# Altium PCB DAPLink GD32F103RCT6.PcbDoc (part 2 of 2)
Units mil, origin at the board's own origin, x right, y up, seen from the top; angles counter-clockwise.
Board outline 3485 x 2855 mil, 2 copper layers (Top Layer, Bottom Layer); 95 components, 93 nets, 322 pads, 225 vias.
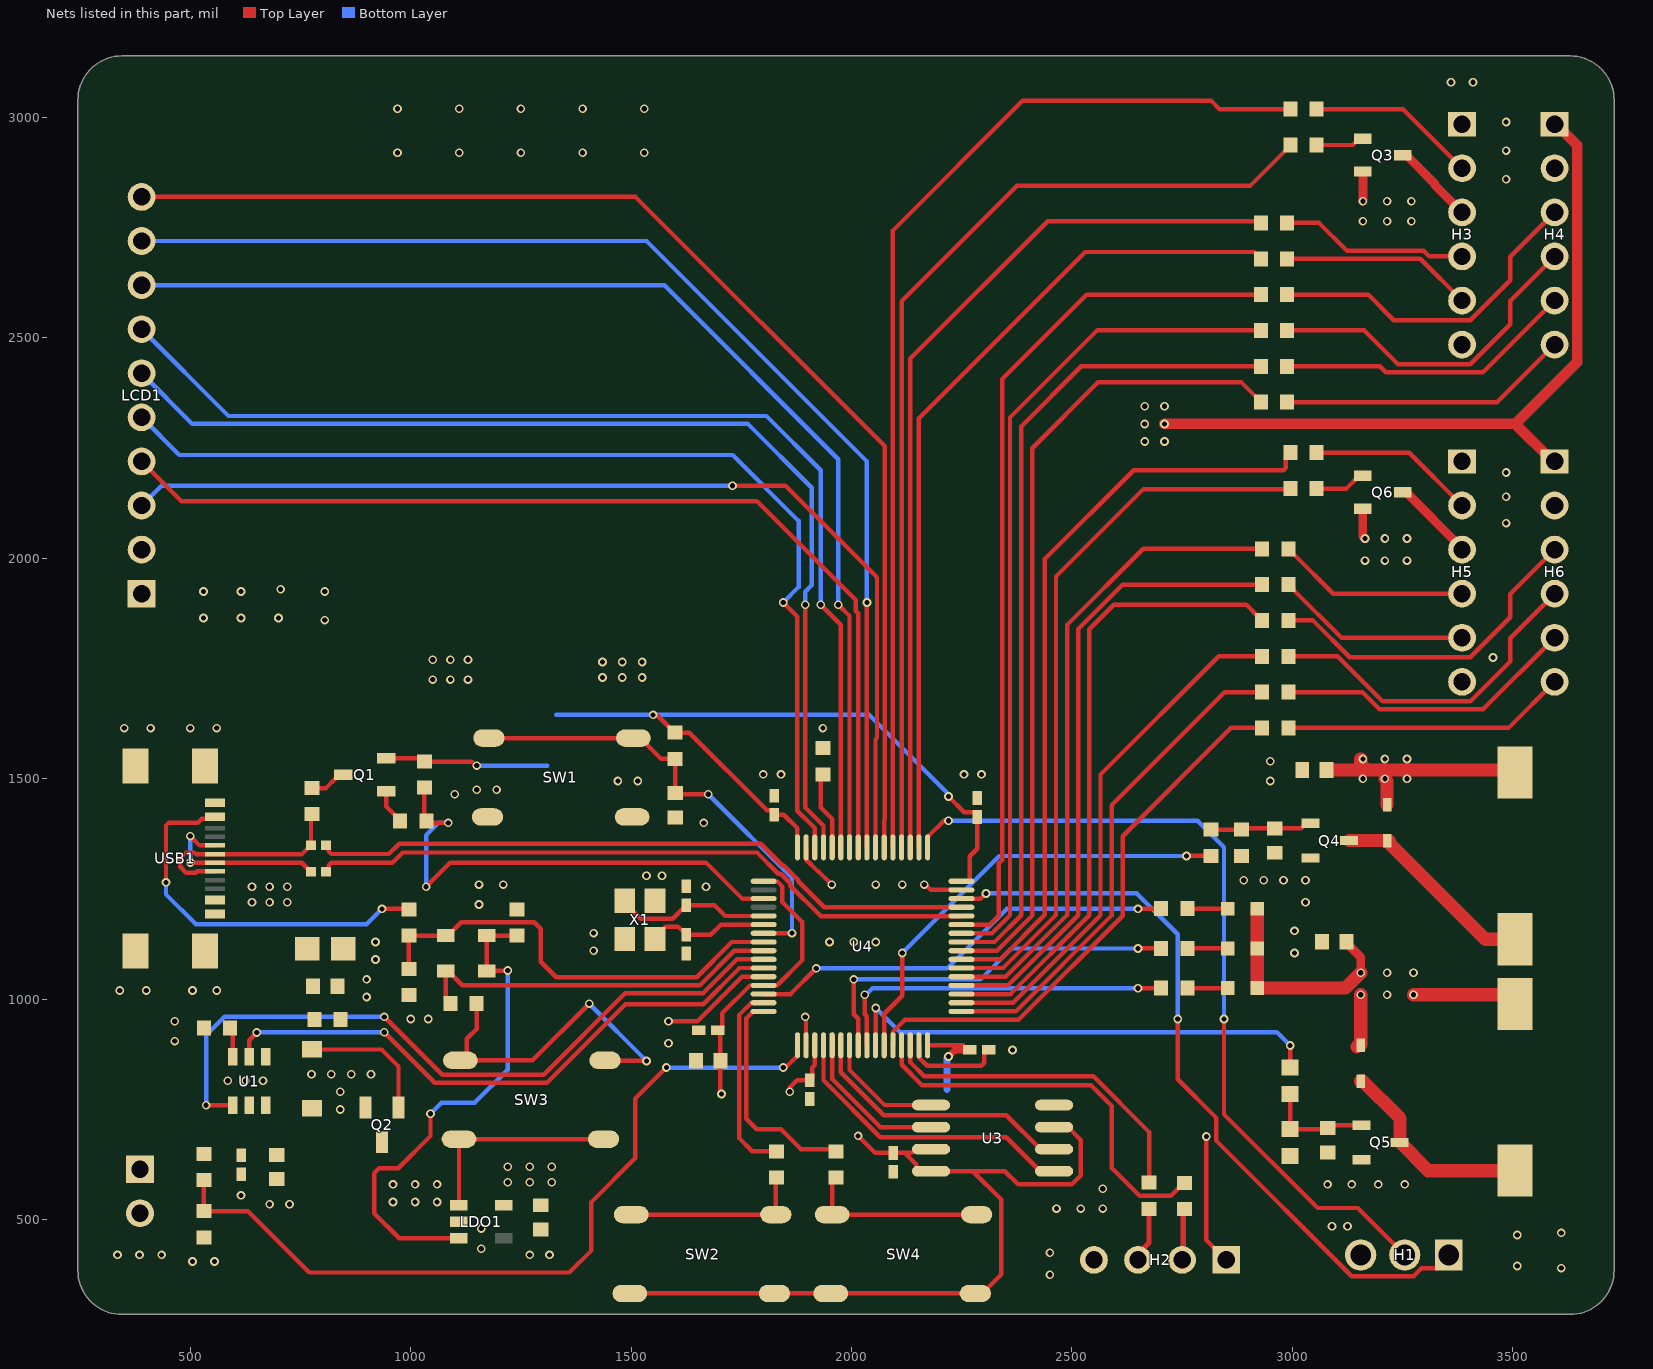
[diagram p2: the nets of this part, all layers, seen from the top]

## Part data
BUZZER1 BUZZER2: "驱动方式:有源(内含驱动线路);构造类型:电磁式;额定电压:3.3V;频率:2.7kHz;声压(SPL):80dB;", Continuous Operating Time=-, Current Consumption=30mA, JLCPCB Part Class="Extended Part", LCSC Part Name="9.6*9.6*5mm电磁有源 3V", Manufacturer=INGHAi(赢海), ManufacturerPart=GSD9605YB-3V2800, Operating Temperature=-20℃~+70℃, Voltage - Supply=2V~5V, Voltage Rating=3.3V, AddInBom=yes, ConvertToPcb=yes, Datasheet=https://item.szlcsc.com/datasheet/GSD9605YB-3V2800/249279.html, Diameter(φD)=-, Driver Circuitry=有源(内含驱动线路), FootprintName=BUZ-SMD_GSD9605YB-3V2800, Height=5.2mm, Lead Pitch=-, Length=9.6mm, ModelId=d9f071f9511e4f7795b1f85db8085480, ModelName=BUZ-SMD_L9.6-W9.6-H5.0, ModelTransform=393.7,377.952,0,270,0,0,0,0,0, Mounting Type=贴片, Sound Pressure Level(SPL)=80dB, Supplier=LCSC, Supplier Footprint=SMD,9.6x9.6mm, SupplierPart=C255327, Symbol=GSD9605YB-3V2800, Technology=电磁式, Width=9.6mm
C1 C7 C9 C10 C11 C12 C13 C14 C16 C17 C18 C19: library part CC0402CRNPO9BN100, "容值:10pF;精度:±0.25pF;额定电压:50V;温度系数:NP0;", JLCPCB Part Class="Extended Part", LCSC Part Name="10pF ±0.25pF 50V", Manufacturer=YAGEO(国巨), Temperature Coefficient=NP0, Tolerance=±0.25pF, Voltage Rated=50V, AddInBom=yes, ConvertToPcb=yes, Datasheet=https://atta.szlcsc.com/upload/public/pdf/source/20200508/C526974_3517A3A30DC68049E27EE400BC6F4C82.pdf, Device=CC0402CRNPO9BN100, FootprintName=C0402, ManufacturerPart=CC0402CRNPO9BN100, ModelId=36a51122f27c49738f86b3bfa98863e0, ModelName=C0402_L1.0-W0.5-H0.5, ModelTransform=39.37,19.685,0,0,0,0,0,0,0, Supplier=LCSC, Supplier Footprint=0402, SupplierPart=C526974, Symbol=CC0402CRNPO9BN100
C2 C4 C5 C15: library part C0603C102K1RAC3083, "容值:1nF;精度:±10%;额定电压:100V;温度系数:X7R;", JLCPCB Part Class="Extended Part", LCSC Part Name="1nF ±10% 100V", Manufacturer=KEMET(基美), Temperature Coefficient=X7R, Tolerance=±10%, Voltage Rated=100V, AddInBom=yes, ConvertToPcb=yes, Datasheet=https://atta.szlcsc.com/upload/public/pdf/source/20200618/C599608_2B9CFB7169FD5127D28BF69D59417288.pdf, Device=C0603C102K1RAC3083, FootprintName=C0603, ManufacturerPart=C0603C102K1RAC3083, ModelId=ac125912035d415993ca9572d50418b1, ModelName=C0603_L1.6-W0.8-H0.8, ModelTransform=62.992,31.496,0,0,0,0,0,0,0, Supplier=LCSC, Supplier Footprint=0603, SupplierPart=C561818, Symbol=C0603C102K1RAC3083
C3: library part CS0805KKX7R8BB105, "容值:1uF;精度:±10%;额定电压:25V;温度系数:X7R;", JLCPCB Part Class="Extended Part", LCSC Part Name="1uF ±10% 25V", Manufacturer=YAGEO(国巨), Temperature Coefficient=X7R, Tolerance=±10%, Voltage Rated=25V, AddInBom=yes, ConvertToPcb=yes, Datasheet=https://atta.szlcsc.com/upload/public/pdf/source/20180820/C272869_BA73BCEFB473D3E1AF31EC64F07F73BB.pdf, Device=CS0805KKX7R8BB105, FootprintName=C0805, ManufacturerPart=CS0805KKX7R8BB105, ModelId=1ba041120af144c991958decab20d241, ModelName=C0805_L2.0-W1.3-H1.3, ModelTransform=78.74,51.181,0,0,0,0,0,0.0005,0, Supplier=LCSC, Supplier Footprint=0805, SupplierPart=C272869, Symbol=CS0805KKX7R8BB105
C6 C8: library part GCM1555C1H200JA16D, "容值:20pF;精度:±5%;额定电压:-;温度系数:-;", JLCPCB Part Class="Extended Part", LCSC Part Name="20pF(200) ±5% 50V", Manufacturer=muRata(村田), Temperature Coefficient=-, Tolerance=±5%, AddInBom=yes, ConvertToPcb=yes, Datasheet=https://atta.szlcsc.com/upload/public/pdf/source/20200713/C701256_2542DCDD70722D2BE0CCE4799A0421BC.pdf, Device=GCM1555C1H200JA16D, FootprintName=C0402, ManufacturerPart=GCM1555C1H200JA16D, ModelId=36a51122f27c49738f86b3bfa98863e0, ModelName=C0402_L1.0-W0.5-H0.5, ModelTransform=39.37,19.685,0,0,0,0,0,0,0, Supplier=LCSC, Supplier Footprint=0402, SupplierPart=C343868, Symbol=GCM1555C1H200JA16D, Voltage Rated=-
D1 D2: "1000V,1A,VF=1.1V@1A，M7小封装", JLCPCB Part Class=扩展库, Manufacturer=MDD, AddInBom=yes, ConvertToPcb=yes, Datasheet=https://atta.szlcsc.com/upload/public/pdf/source/20180525/C193404_0C623596A90FA1D1FBDCFE625FBC3C97.pdf, Device=1N4007WS, FootprintName=SOD-323_L1.8-W1.3-LS2.5-RD, LCSC Part Name=1N4007WS, ManufacturerPart=1N4007WS, ModelId=e9dd044ee7bf4221b3b795eb56bce7c0, ModelName=SOD-323_L1.7-W1.3-H1.1-LS2.5, ModelTransform=98.91933,51.181,0,180,0,0,0.985,-0.0005,0, Supplier=LCSC, Supplier Footprint=SOD-323, SupplierPart=C193404, Symbol=1N4007WS
D3: library part "DSK24 K24", "直流反向耐压(Vr):40V;平均整流电流(Io):2A;正向压降(Vf):550mV@2A;", Average Rectified Current (Io)=2A, Forward Voltage (Vf@If)=550mV@2A, JLCPCB Part Class="Extended Part", LCSC Part Name="40V 2A 550mV@2A", Manufacturer=MDD, Reverse Voltage (Vr)=40V, AddInBom=yes, ConvertToPcb=yes, Datasheet=https://atta.szlcsc.com/upload/public/pdf/source/20190305/C64890_FF2133F90E969198891C9074DED26AB5.pdf, Device="DSK24 K24", FootprintName=SOD-123_L2.8-W1.8-LS3.7-RD, ManufacturerPart="DSK24 K24", ModelId=7884390a25fb4c08947731ebfba7e3f8, ModelName=SOD-123_L2.8-W1.8-LS3.7-RD, ModelTransform=144.9,63,0,0,0,0,0,0,0, Supplier=LCSC, Supplier Footprint=SOD-123FL, SupplierPart=C64890, Symbol="DSK24 K24"
D4 D5: "二极管配置:独立式;整流电流:150mA;直流反向耐压(Vr):100V;正向压降(Vf):1.25V@150mA;反向恢复时间(Trr):4ns;", Current - Rectified=150mA, JLCPCB Part Class="Extended Part", LCSC Part Name="100V 150mA", Manufacturer=R+O(宏嘉诚), ManufacturerPart=1N4148WS, Non-Repetitive Peak Forward Surge Current=2A, Operating Junction Temperature Range=-55℃~+150℃, Pd - Power Dissipation=200mW, Reverse Leakage Current (Ir)=1uA@75V, Voltage - DC Reverse(Vr)=100V, Voltage - Forward(Vf@If)=1.25V@150mA, AddInBom=yes, ConvertToPcb=yes, Datasheet=https://item.szlcsc.com/datasheet/1N4148WS/8397141.html, Diode Configuration=独立式, FootprintName=SOD-323_L1.7-W1.3-LS2.5-FD, ModelId=0f2f330c645944df9245ac3c3fec3456, ModelName=SOD-323_L1.7-W1.3-LS2.5-FD, ModelTransform=98.425,49.2125,0,180,0,0,0,0,0, Reverse Recovery Time (trr)=4ns, Supplier=LCSC, Supplier Footprint=SOD-323, SupplierPart=C7420319, Symbol=1N4148WS_C7420319
H1: library part 2.54-1*3P针, "间距:2.54mm;总PIN位数:3;排数:1;插针结构:-;行距:-;安装类型:直插;圆针/方针:-;额定电流:-;额定电压:-;配合针长度:-;塑高:-;触头材质:-;触头镀层:-;颜色:黑色;", Color=黑色, Current Rating (Max)=-, JLCPCB Part Class="Extended Part", LCSC Part Name=2.54mm, Manufacturer=BOOMELE(博穆精密), AddInBom=yes, Circluar Pins/Square Pins=-, Contact Material=-, Contact Plating=-, ConvertToPcb=yes, Datasheet=https://atta.szlcsc.com/upload/public/pdf/source/20151109/1457707570948.pdf, Device=2.54-1*3P针, FootprintName=HDR-TH_3P-P2.54-V-M-1, Insulation Height=-, Length of Mating Pin=-, ManufacturerPart=2.54-1*3P针, ModelId=94a8ffe137b6410295cb18cd3ffd99db, ModelName=HDR-M-2.54_1x3, ModelTransform=300,100,0,0,0,0,0,0,-118.1, Mounting Type=直插, Number of Pins=3, Number of Rows=1, Pin Structure=-, Pitch=2.54mm, Row Spacing=-, Supplier=LCSC, Supplier Footprint=插件, SupplierPart=C49257, Symbol=Header-Male-2.54_1x3, Voltage Rating (Max)=-
H2: "插针结构:1x4P;间距:2.54mm;圆针/方针:方针;安装方式:直插;排数:单排;总PIN位数:4P;额定电流:3A;额定电压:250V;配合针长度:6mm;塑高:2.5mm;端接针长度:3mm;触头材质:黄铜;触头镀层:金;工作温度:-25℃~+80℃;颜色:黑色;", Color=黑色, Current Rating=3A, JLCPCB Part Class="Extended Part", LCSC Part Name="1x4P 间距:2.54mm 方针 直插", Manufacturer=LAILAN(莱联), ManufacturerPart=LAIL-PZ2.54-4P-L, Operating Temperature=-25℃~+80℃, Voltage Rating (Max)=250V, AddInBom=yes, Circluar Pins/Square Pins=方针, Contact Material=黄铜, Contact Plating=金, ConvertToPcb=yes, Datasheet=https://item.szlcsc.com/datasheet/LAIL-PZ2.54-4P-L/58519955.html, FootprintName=CONN-TH_LAIL-PZ2.54-4P-L, Insulation Height=2.5mm, Length of End Connection Pin=3mm, Length of Mating Pin=6mm, ModelId=112b012cb4004446aa5386c9c86d05f0, ModelName=CONN-TH_LAIL-PZ2.54-4P-L, ModelTransform=400.039,100,0,0,0,0,0,0,-118.11, Mounting Type=直插, Number of Pins=4P, Number of Rows=单排, Pin Structure=1x4P, Pitch=2.54mm, Supplier=LCSC, Supplier Footprint=插件,P=2.54mm, SupplierPart=C54950602, SymbolName=LAIL-PZ2.54-4P-L
H3 H4 H5 H6: "插针结构:1x6P;间距:2.54mm;圆针/方针:方针;安装方式:直插;排数:单排;总PIN位数:6P;额定电流:3A;额定电压:250V;配合针长度:6mm;塑高:2.5mm;端接针长度:3mm;触头材质:黄铜;触头镀层:金;工作温度:-25℃~+80℃;颜色:黑色;", Color=黑色, Current Rating=3A, JLCPCB Part Class="Extended Part", LCSC Part Name="1x6P 间距:2.54mm 方针 直插", Manufacturer=LAILAN(莱联), ManufacturerPart=LAIL-PZ2.54-6P-L, Operating Temperature=-25℃~+80℃, Voltage Rating (Max)=250V, AddInBom=yes, Circluar Pins/Square Pins=方针, Contact Material=黄铜, Contact Plating=金, ConvertToPcb=yes, Datasheet=https://item.szlcsc.com/datasheet/LAIL-PZ2.54-6P-L/58519960.html, FootprintName=CONN-TH_LAIL-PZ2.54-6P-L, Insulation Height=2.5mm, Length of End Connection Pin=3mm, Length of Mating Pin=6mm, ModelId=78d66b34ad7c4f8faa1ccf54151694d8, ModelName=CONN-TH_LAIL-PZ2.54-6P-L, ModelTransform=599.999,98.8187,0,0,0,0,0,0,-118.11, Mounting Type=直插, Number of Pins=6P, Number of Rows=单排, Pin Structure=1x6P, Pitch=2.54mm, Supplier=LCSC, Supplier Footprint=插件,P=2.54mm, SupplierPart=C54950607, SymbolName=LAIL-PZ2.54-6P-L
LCD1: "核心芯片:ST7789;尺寸(inch):2;像素分辨率:320x240;", JLCPCB Part Class="Extended Part", LCSC Part Name=2.0寸240*320(RGB)彩色SPI串口TFT液晶显示屏, Manufacturer=HS(汉昇), ManufacturerPart=HS20S010B, Operating Temperature=-20℃~+70℃, AddInBom=yes, Controller Type=ST7789, ConvertToPcb=yes, Datasheet=https://item.szlcsc.com/datasheet/HS20S010B/6087847.html, Dot Pixels=320x240, FootprintName=LCD-TH_HS20S010B, ModelId=0121547e629f428887221e14eec3ec9e, ModelName=LCD-TH_HS20S010B, ModelTransform=1425.194,2488.18384,0,0,0,0,0,0,0, Size=2, Supplier=LCSC, Supplier Footprint=-, SupplierPart=C5329586, Symbol=HS20S010B
LDO1: library part ME6211C33M5G-N, "输出类型:固定;输出极性:正;输出通道数:1;最大输入电压:6V;输出电压:3.3V;压差:260mV@(200mA);输出电流:500mA;电源纹波抑制比(PRSS):70dB@(1kHz),62dB@(10kHz);", Dropout Voltage=260mV@(200mA), JLCPCB Part Class="Extended Part", LCSC Part Name="Vin=6V Vout=3.3V 500mA 70dB@(1kHz),62dB@(10kHz)", Manufacturer=MICRONE(南京微盟), Maximum Input Voltage=6V, Output Current=500mA, Output Voltage=3.3V, Power Supply Rejection Ratio (PRSS)=70dB@(1kHz),62dB@(10kHz), AddInBom=yes, ConvertToPcb=yes, Datasheet=https://atta.szlcsc.com/upload/public/pdf/source/20170918/C82942_1505727073070976520.pdf, Device=ME6211C33M5G-N, FootprintName=SOT-23-5_L3.0-W1.7-P0.95-LS2.8-BR, ManufacturerPart=ME6211C33M5G-N, ModelId=0a2a1b8f50944f73965918ad6e5fe167, ModelName=SOT-23-5_L2.9-W1.6-H1.1-LS2.8-P0.95, ModelTransform=114.2,109.6,0,180,0,0,-0.9,0.9,0, Number of Outputs=1, Output Polarity=正, Output Type=固定, Supplier=LCSC, Supplier Footprint=SOT-23-5, SupplierPart=C82942, Symbol=ME6211C33M5G-N
LED1 LED2 LED3: library part NCD0603B4, "发光颜色:蓝灯;", Emitted Color=蓝灯, JLCPCB Part Class="Extended Part", Manufacturer=国星光电, AddInBom=yes, ConvertToPcb=yes, Datasheet=https://atta.szlcsc.com/upload/public/pdf/source/20200820/C89814_3D11357C976AB31B19046E836063F91D.pdf, Device=NCD0603B4, FootprintName=LED0603-R-RD, LCSC Part Name=蓝灯, ManufacturerPart=NCD0603B4, ModelId=eca76de2c48042b48052f5876bb6c831, ModelName=LED0603-R-RD, ModelTransform=63.7794,31.496,0,0,0,0,0,0,0, Supplier=LCSC, Supplier Footprint=0603, SupplierPart=C89814, Symbol=FC-F1608BK-470H5
Q1: library part S8550_C105432, "晶体管类型:PNP;集射极击穿电压(Vceo):25V;集电极电流(Ic):500mA;功率(Pd):300mW;集电极截止电流(Icbo):100nA;集电极-发射极饱和电压(VCE(sat)@Ic,Ib):600mV@500mA,50mA;直流电流增益(hFE@Ic,Vce):120@50mA,1V;特征频率(fT):150MHz;工作温度:+150℃@(Tj);", Collector Current (Ic)=500mA, Collector Cut-Off Current (Icbo)=100nA, Collector-Emitter Breakdown Voltage (Vceo)=25V, Collector-Emitter Saturation Voltage (VCE(sat)@Ic,Ib)=600mV@500mA,50mA, DC Current Gain (hFE@Ic,Vce)=120@50mA,1V, JLCPCB Part Class=基础库, LCSC Part Name="PNP 25V 500mA L档120-200", Manufacturer=CJ(江苏长电/长晶), Operating Temperature=+150℃@(Tj), Power Dissipation (Pd)=300mW, Transition Frequency (fT)=150MHz, AddInBom=yes, ConvertToPcb=yes, Datasheet=https://atta.szlcsc.com/upload/public/pdf/source/20170413/1492062713649.pdf, Device=S8550_C105432, FootprintName=SOT-23-3_L2.9-W1.6-P1.90-LS2.8-BR, ManufacturerPart=S8550, ModelId=89cb27a44ab2466697082bb9fd73a7d0, ModelName=SOT-23-3L_L2.9-W1.6-H1.1-LS2.8-P0.95, ModelTransform=110.236,114.173,0,180,0,0,-0.005,0.0005,0, Supplier=LCSC, Supplier Footprint=SOT-23-3L, SupplierPart=C105432, Symbol=S8550_C105432, Transistor Type=PNP
Q2: library part AO3423, "类型:P沟道;漏源电压(Vdss):20V;连续漏极电流(Id):4.5A;功率(Pd):1.25W;导通电阻(RDS(on)@Vgs,Id):35mΩ@10V,5.1A;阈值电压(Vgs(th)@Id):1.5V@250A;", Continuous Drain Current (Id)=4.5A, Drain Source On Resistance (RDS(on)@Vgs,Id)=35mΩ@10V,5.1A, Drain Source Voltage (Vdss)=20V, Gate Threshold Voltage (Vgs(th)@Id)=1.5V@250A, JLCPCB Part Class="Extended Part", LCSC Part Name="P沟道 20V 4.5A", Manufacturer=VBsemi(台湾微碧), Power Dissipation (Pd)=1.25W, AddInBom=yes, ConvertToPcb=yes, Datasheet=https://atta.szlcsc.com/upload/public/pdf/source/20200629/C692958_8E3397F4108F33A40C5B9FD9962FA608.pdf, Device=AO3423, FootprintName=SOT-23-3_L2.9-W1.3-P1.90-LS2.4-BR, ManufacturerPart=AO3423, ModelId=c62791f0466c4ae2a892c056b845b0ca, ModelName=SOT-23-3P_L2.9-W1.3-H1.0-LS2.4-P0.95, ModelTransform=98.425,114.173,0,180,0,0,0.0005,-0.0005,0, Supplier=LCSC, Supplier Footprint=SOT-23-3, SupplierPart=C692958, Symbol=AO3423_C692958, Type=P沟道
Q3 Q6: "数量:1个P沟道;漏源电压(Vdss):30V;连续漏极电流(Id):4A;导通电阻(RDS(on)):47mΩ@10V；85mΩ@2.5V；60mΩ@4.5V;耗散功率(Pd):-;阈值电压(Vgs(th)):900mV;", Current - Continuous Drain(Id)=4A, Drain to Source Voltage=30V, Gate Threshold Voltage (Vgs(th))=900mV, Input Capacitance(Ciss)=645pF, JLCPCB Part Class="Basic Part", LCSC Part Name="1个P沟道 耐压:30V 电流:4A", Manufacturer=AOS, ManufacturerPart=AO3401A, Operating Temperature=-, Output Capacitance(Coss)=80pF, Reverse Transfer Capacitance (Crss@Vds)=55pF, AddInBom=yes, ConvertToPcb=yes, Datasheet=https://item.szlcsc.com/datasheet/AO3401A/15801.html, FootprintName=SOT-23_L2.9-W1.3-P1.90-LS2.4-BR, Gate Charge(Qg)=14nC@10V, ModelId=c62791f0466c4ae2a892c056b845b0ca, ModelName=SOT-23-3P_L2.9-W1.3-H1.0-LS2.4-P0.95, ModelTransform=98.64468,114.173,0,180,0,0,0.001,-0.002,0, Number=1个P沟道, Pd - Power Dissipation=-, RDS(on)=47mΩ@10V；85mΩ@2.5V；60mΩ@4.5V, Supplier=LCSC, Supplier Footprint=SOT-23, SupplierPart=C15127, Symbol=AO3401A, Type=-
Q4 Q5: "晶体管类型:NPN;集电极电流(Ic):1.5A;集射极击穿电压(Vceo):25V;耗散功率(Pd):300mW;直流电流增益(hFE):400;", Collector - Emitter Voltage VCEO=25V, Current - Collector Cutoff=100nA, Current - Collector(Ic)=1.5A, DC Current Gain=400, Emitter-Base Voltage(Vebo)=5V, JLCPCB Part Class="Extended Part", LCSC Part Name="NPN 电流:1.5A 电压:25V", Manufacturer=TDSEMIC(拓电半导体), ManufacturerPart="SS8050 Y1", Operating Temperature=-, Pd - Power Dissipation=300mW, Transition frequency(fT)=100MHz, AddInBom=yes, Configuration=-, ConvertToPcb=yes, Datasheet=https://item.szlcsc.com/datasheet/SS8050%2520Y1/44491119.html, FootprintName=SOT-23-3_L2.9-W1.5-P2.0-LS2.5-BR, ModelId=d6da7d402cef4f10869fb4f7686eaa0f, ModelName=SOT-23-3_L2.9-W1.5-P2.0-LS2.5-BR, ModelTransform=102.362,114.173,0,0,0,0,-0.001,0.002,0, Number=1个NPN, Supplier=LCSC, Supplier Footprint=SOT-23, SupplierPart=C42441445, Symbol="SS8050 Y1_C42441445", Type=NPN, Vce Saturation(VCE(sat))=500mV
R1 R2 R3 R4 R5 R6 R7 R8 R9 R10 R11 R12 R13 R14 R15 R16 R17 R18 R19 R20 R21 R22 R23 R24 R25 R26 R27 R32 R33 R34 R35 R36 R37 R38 R39 R40 R41 R42: library part RT0402BRD0722KL, "电阻类型:薄膜电阻;阻值:22kΩ;精度:±0.1%;功率:62.5mW;温度系数:±25ppm/;最大工作电压:50V;工作温度范围:-55~+155;", JLCPCB Part Class="Extended Part", LCSC Part Name="22kΩ ±0.1%", Manufacturer=YAGEO(国巨), Operating Temperature Range=-55~+155, Overload Voltage (Max)=50V, Power(Watts)=62.5mW, Temperature Coefficient=±25ppm/, Tolerance=±0.1%, AddInBom=yes, ConvertToPcb=yes, Datasheet=https://atta.szlcsc.com/upload/public/pdf/source/20181031/C326601_1F60CD1C11470B123D5B3D7B2D1FCF5A.pdf, Device=RT0402BRD0722KL, FootprintName=R0402, ManufacturerPart=RT0402BRD0722KL, ModelId=671aefced39d4c318694bba8bd8efd39, ModelName=R0402_L1.0-W0.5-H0.5, ModelTransform=39.37,19.685,0,0,0,0,0,0.0005,0, Supplier=LCSC, Supplier Footprint=0402, Symbol=RT0402BRD0722KL, Type=薄膜电阻
  R1 R2 R3 R4 R5 R6 R7 R8 R9 R10 R11 R13 R14 R15 R16 R17 R18 R19 R20 R21 R22 R23 R24 R25 R26 R27 R32 R34 R35 R36 R37 R38 R39 R40 R41 R42: SupplierPart=C326601
R28 R29 R30 R31: library part 0603waf1001t5e, "电阻类型:厚膜电阻;阻值:1kΩ;精度:±1%;功率:100mW;工作电压:75V;温度系数:±100ppm/℃;", JLCPCB Part Class="Basic Part", LCSC Part Name="1kΩ ±1% 100mW 厚膜电阻", Manufacturer=UNI-ROYAL(厚声), ManufacturerPart=0603WAF1001T5E, Operating Temperature=-55℃~+155℃, Power(Watts)=100mW, Temperature Coefficient=±100ppm/℃, Tolerance=±1%, Voltage-Supply(Max)=75V, AddInBom=yes, ConvertToPcb=yes, Datasheet=https://item.szlcsc.com/datasheet/0603WAF1001T5E/21904.html, FootprintName=R0603, ModelId=fc143cca1e79419f9cd78b61e9279f08, ModelName=R0603, ModelTransform=31.8897,63.7794,0,90,0,0,0,0,0, Supplier=LCSC, Supplier Footprint=0603, SupplierPart=C21190, Symbol=0603WAF1001T5E, Type=厚膜电阻
SW1 SW2 SW3 SW4: "轻触按键", Designer=U?, Device=TS-1002S-07526C, Symbol=TS-1002S-07526C
U1: "充电电池的类型:-;电池单元组数:-;最大充电电流:-;充满的电池组电压:-;最大供应电压:-;", Battery Pack Voltage=-, JLCPCB Part Class="Extended Part", Manufacturer=TOPPOWER(南京拓微), AddInBom=yes, Battery Chemistry=-, Charge Current - Max=-, ConvertToPcb=yes, Datasheet=https://atta.szlcsc.com/upload/public/pdf/source/20161128/1480296095027.pdf, Device=TP4059, FootprintName=SOT-23-6_L2.9-W1.6-P0.95-LS2.8-BR, Interface=-, LCSC Part Name=TP4059, ManufacturerPart=TP4059, ModelId=18da8f6c14a34920b3e136b5c401a119, ModelName=SOT-23-6_L2.9-W1.6-H1.5-LS2.8-P0.95, ModelTransform=110.7,114.2,0,180,0,0,0,0,0, Number of Cells=-, Supplier=LCSC, Supplier Footprint=SOT-23-6, SupplierPart=C80364, Symbol=TP4059, Voltage - Supply (Max)=-
U2: library part T2B-SQ(LF)(SN), JLCPCB Part Class="Extended Part", Manufacturer=JST, AddInBom=yes, ConvertToPcb=yes, Datasheet=https://atta.szlcsc.com/upload/public/pdf/source/20190115/C265429_C14C29889883140BDA304A73A8EC7CF8.pdf, Device=T2B-SQ(LF)(SN), FootprintName=CONN-TH_T2B-SQ-LF-SN, LCSC Part Name=T2B-SQ(LF)(SN), ManufacturerPart=T2B-SQ(LF)(SN), ModelId=56efb3bde5a34c4d8b168c6906234046, ModelName=CONN-TH_T2B-SQ(LF)(SN), ModelTransform=200,94.5,0,0,0,0,0,0,-118.1, Supplier=LCSC, Supplier Footprint=插件,P=2.54mm, SupplierPart=C265429, Symbol=T2B-SQ(LF)(SN)
U3: library part GD25Q128ESIG, "存储器类型:-;存储器构架(格式):-;技术:-;存储器容量:-;时钟频率:-;存储器接口类型:-;", Clock Frequency=-, JLCPCB Part Class="Extended Part", Manufacturer=GigaDevice(兆易创新), AddInBom=yes, Byte-Program Time - tBP=-, ConvertToPcb=yes, Datasheet=https://atta.szlcsc.com/upload/public/pdf/source/20210423/C2758105_5B8FF46BBA9FF880A5F3E50B6815040C.pdf, Device=GD25Q128ESIG, FootprintName=SOP-8_L5.3-W5.2-P1.27-LS7.9-BL, LCSC Part Name=GD25Q128ESIG, ManufacturerPart=GD25Q128ESIG, Memory Format=-, Memory Interface=-, Memory Size=-, Memory Type=-, ModelId=b3bace262c53465a9e6115a2e0c7b3cc, ModelName=SOP-8_L5.3-W5.2-P1.27-LS7.9-BL, ModelTransform=205.9,311,0,0,0,0,0,0,0, Operating Temperature=-, Page Programming Time - tPP=-, Supplier=LCSC, Supplier Footprint=SOP-8, SupplierPart=C2758105, Symbol=GD25Q128ESIG, Technology=-, Voltage - Supply=-
U4: "CPU内核:ARM Cortex-M3;CPU最大主频:108MHz;CPU位数:32 Bit;", JLCPCB Part Class="Extended Part", LCSC Part Name="Arm® Cortex®-M3 32-bit MCU", Manufacturer=GigaDevice(兆易创新), ManufacturerPart=GD32F103RCT6, Operating Temperature=-40℃~+85℃, Voltage - Supply=2.6V~3.6V, ADC (Bit)=12bit, AddInBom=yes, ConvertToPcb=yes, Core Size="32 Bit", CPU Core="ARM Cortex-M3", CPU Maximum Speed=108MHz, DAC (Bit)=12bit, Datasheet=https://item.szlcsc.com/datasheet/GD32F103RCT6/81837.html, EEPROM=-, Features=日历功能；内置通用定时器；外部管脚复位(NRST), FootprintName=LQFP-64_L10.0-W10.0-P0.50-LS12.0-BL, ModelId=cd9de06618c44fcf82654c43a457f83c, ModelName=LQFP-64_L10.0-W10.0-H1.4-LS12.0-P0.50, ModelTransform=472.441,472.441,0,0,0,0,0,0.465,0, Number of I/O=51, Oscillator Type=内置+外置, Program Memory Type=FLASH, Program Storage Size=256KB, RAM Size=48KB, Supplier=LCSC, Supplier Footprint=LQFP-64(10x10), SupplierPart=C80687, Symbol=GD32F103RCT6
USB1: library part "TYPE-C 16P QTGM027", "连接器类型:Type-C;标准:-;公母:母座;触点数量:16;端口数量:1;安装方式:卧贴;额定电流 - 电源:3A;工作温度范围:-30~+80;", Current Rating - Power (Max)=3A, JLCPCB Part Class="Extended Part", LCSC Part Name="Type-C 母座 卧贴 不锈钢外壳 2次模顶", Manufacturer="SHOU HAN(首韩)", Operating Temperature Range=-30~+80, AddInBom=yes, Connector Type=Type-C, ConvertToPcb=yes, Datasheet=https://atta.szlcsc.com/upload/public/pdf/source/20210224/C2681552_6D044BA0C1A7352EAF06092454113915.pdf, Device="TYPE-C 16P QTGM027", FootprintName=USB-C-SMD_TYPE-C-16P-QTGM027, Gender=母座, ManufacturerPart="TYPE-C 16P QTGM027", ModelId=23a4a22a604646cabb08998501ada542, ModelName=USB-C-SMD_TYPE-C-16P-QTGM027, ModelTransform=460.6,303.1,0,0,0,0,0,-50.4,-31.5, Mounting Style=卧贴, Number of Contacts=16, Number of Ports=1, Standard=-, Supplier=LCSC, Supplier Footprint=SMD, SupplierPart=C2681552, Symbol="TYPE-C 16P QTGM027"
X1: library part X32258MOB4SI, "晶振类型:贴片无源晶振;频率:8MHz;频率公差:±10ppm;频率稳定度:±30ppm;负载电容:12pF;工作温度:-40~+85;", Frequency Stability=±30ppm, Frequency Tolerance=±10ppm, JLCPCB Part Class="Extended Part", LCSC Part Name="YSX321SL 8MHz 12pF ±10ppm", Load Capacitance=12pF, Manufacturer=YXC扬兴科技, Operating Temperature=-40~+85, AddInBom=yes, ConvertToPcb=yes, Crystal Type=贴片无源晶振, Datasheet=https://atta.szlcsc.com/upload/public/pdf/source/20210106/C2682774_0CD4FDA5D9DA3FBEEC23BD607A48E4B0.pdf, Device=X32258MOB4SI, FootprintName=OSC-SMD_4P-L3.2-W2.5-BL, ManufacturerPart=X32258MOB4SI, ModelId=ae22b8d143894765bc8100c37cb6356f, ModelName=OSC-SMD_4P-L3.2-W2.5-H1.0, ModelTransform=125.984,98.425,0,0,0,0,0,0.005,0, Supplier=LCSC, Supplier Footprint=SMD3225-4P, SupplierPart=C2682775, Symbol=X32258MOB4SI

## Via types
v1: diameter 19.68, hole 11.81, Top Layer to Bottom Layer, tented both sides, 225 vias

## Nets (pads, with @x,y where several pads share a name; then routed paths per layer and width w, separated by ;. In a path a pad name is that pad's centre, name@x,y a point inside that pad or via, vN(x,y) a via of type N, cw(c..) or ccw(c..) an arc to the next point about the centre after c; other vN are vias at no path point)
3.3V: BUZZER1.1 BUZZER2.1 C5.2 C9.1 C10.2 C11.2 C12.2 C13.2 C14.2 C15.2 C16.1 C17.1 D4.2 D5.2 H2.1 LCD1.2 LDO1.5 LED1.1 LED2.1 LED3.1 Q1.2 Q3.2 Q6.2 R10.1 R14.2 SW2.1 SW2.2 SW4.1 SW4.2 U3.3 U3.7 U3.8 U4.1 U4.13 U4.19 U4.32 U4.48 U4.64 | length 6859.4
  Top Layer w10: Q1.2@944.55,1546.8 1023.21,1546.8 R10.1@1030.95,1539.06 1138.32,1539.06 1147.38,1530 v1(1150,1530) ; SW2.2@1497.12,332.6 SW2.1@1825.07,332.6 SW4.2@1952.82,332.6 SW4.1@2280.77,332.6 2296.52,332.6 2340,376.08 2340,545 2275,610 ; v1(1550,1645) 1551.85,1643.15 1560.38,1643.15 1598.87,1604.66 R14.2@1600,1604.66 1632.01,1604.66 1807.62,1429.05 1819.35,1429.05 1825,1423.4 C13.2@1825,1418.5 1846.5,1418.5 1877.35,1387.65 U4.64@1877.35,1344.41 ; C11.2@1696.5,930 C11.2@1696.95,930 ; v1(1705,785) 1702.6,787.4 C15.2@1702.6,860 1702.6,924.35 C11.2@1696.95,930 ; U4.1@1800.59,1267.64 1800.94,1267.29 1825.84,1267.29 1826.28,1266.86 1832.05,1266.86 1843.12,1255.78 1843.12,1220.52 1887.84,1175.8 1887.84,1087.99 1831.62,1031.77 1800.93,1031.77 U4.13@1800.59,1031.42 1800.24,1031.07 1769.58,1031.07 1707.05,968.54 1707.05,935.65 1701.4,930 C11.2@1696.95,930 ; v1(1860,790) 1860,800 1876.5,816.5 C14.2@1905,816.5 1910.65,822.15 1910.65,844.99 1916.72,851.06 U4.19@1916.72,895.59 ; v1(2015,690) 2053.6,651.4 C9.1@2095,651.4 2120.65,651.4 ; U4.32@2172.63,895.59 2253.01,895.59 C10.2@2263.6,885 ; U3.7@2180.5,660 2145.31,660 2136.71,651.4 2120.65,651.4 ; v1(2220,1460) 2255.95,1424.05 2279.35,1424.05 2285,1418.4 C12.2@2285,1413.5 2285,1341.53 2268.03,1324.55 2268.03,1268.48 2267.19,1267.64 U4.48@2249.41,1267.64 ; U3.3@2459.5,710 2490.9,710 2520,680.9 2520,600 2500,580 2377.9,580 2347.9,610 2275,610 ; v1(2805,688.78) 2805,453.78 H2.1@2850,408.78 ; 2120.65,651.4 2146.42,625.63 2146.42,616.47 2152.89,610 U3.8@2180.5,610 2275,610
  Top Layer w16: v1(2220,870) 2235,885 C10.2@2263.6,885
  Top Layer w20: C17.1@3122.6,1130 3122.6,1128.05 3155,1095.65 v1(3155,1060) ; Q6.2@3159.72,2112.6 3159.72,2050.28 v1(3165,2045) ; Q3.2@3159.72,2877.6 3160,2877.32 v1(3160,2810)
  Top Layer w30: LED1.1@2920.5,1205.3 LED2.1@2920.5,1115.3 LED3.1@2920.5,1025.3 3120.3,1025.3 v1(3155,1060) ; C16.1@3077.6,1521.95 C16.1@3077.6,1520 3160,1520 ; D5.2@3146.66,892.4 3150.2,895.94 D5.2@3155,895.94 v1(3155,1010) ; v1@3155,1545 3155,1534.35 3160,1529.35 3160,1520 ; v1(3210,1500) 3215,1495 D4.2@3215,1440.94 ; v1(3275,1010) 3483.98,1010 BUZZER2.1@3505,988.98 ; BUZZER1.1@3491.02,1500 BUZZER1.1@3505,1513.98 3498.98,1520 3160,1520
  Bottom Layer w10: v1(1150,1530) 1310,1530 ; 1330,1645 v1(1550,1645) 2040,1645 2220,1465 v1(2220,1460)
  Bottom Layer w16: 2216.5,795 2216.5,866.5 v1(2220,870)
  other v1: 1220,585 1270,585 1320,585 1220,620 1270,620 1320,620 3215,1010 3215,1060 3275,1060 3160,1500 3260,1500 3160,1545 3210,1545 3260,1545 3165,1995 3210,1995 3260,1995 3210,2045 3260,2045 3160,2765 3215,2765 3270,2765 3215,2810 3270,2810
5V: C3.1 C4.1 D3.2 H4.1 H6.1 Q2.1 R6.1 U1.4 USB1.A9 | length 1987.6
  Top Layer w10: D3.2@775.95,886 934,886 972.4,847.6 Q2.1@972.4,754.4
  Top Layer w24: v1(2710,2305) 3506.07,2305 ; H6.1@3595,2220 3591.06,2220 3506.07,2305 ; H4.1@3595,2985 3598.94,2985 3646.5,2937.44 3646.5,2445.43 3506.07,2305
  other v1: 640,1220 680,1220 720,1220 640,1255 680,1255 720,1255 1050,1725 1090,1725 1130,1725 1435,1730 1480,1730 1525,1730 1435,1765 1480,1765 1525,1765 1050,1770 1090,1770 1130,1770 2665,2265 2710,2265 2665,2305 2665,2345 2710,2345
5V_S: R1.2 USB1.A4 | length 869.5
  Top Layer w10: v1(445,1265) 445,1394.14 450.86,1400 516.93,1400 525.98,1409.05 551.2,1409.05 USB1.A4@556.05,1413.9 ; v1(935,1205) 995.01,1205 R1.2@995.95,1204.06
  Bottom Layer w10: v1(445,1265) 445,1237.77 512.77,1170 900,1170 v1(935,1205)
BAT: C1.2 C2.2 Q2.3 R11.2 U1.3 U2.1
BAT_ADC: R11.1 R12.2 U4.17 | length 1846.1
  Top Layer w10: R11.1@530.95,589.74 R12.2@530.95,519.06 ; R12.2@531.29,519.4 R12.2@530.95,519.06 ; v1(1580,845) 1509.07,774.07 1509.07,639.07 1410,540 1410,430 1360,380 770,380 630.94,519.06 R12.2@530.95,519.06 ; v1(1845,845) 1850.39,845 1877.35,871.97 U4.17@1877.35,895.59
  Bottom Layer w10: v1(1580,845) v1(1845,845)
BOOT: R13.2 U4.60 | length 178.8
  Top Layer w10: R13.2@1935,1510.34 1930,1505.34 1930,1435 1956.09,1408.91 U4.60@1956.09,1344.41
BUZZER1: R28.1 U4.27 | length 1017.6
  Top Layer w10: U4.27@2074.2,895.59 2074.2,966.9 2115,1007.7 v1(2115,1105) ; v1(2760,1325) 2760.34,1325.34 R28.1@2815,1325.34
  Bottom Layer w10: v1(2115,1105) 2335,1325 v1(2760,1325)
BUZZER2: R29.1 U4.26 | length 1109.5
  Top Layer w10: U4.26@2054.52,895.59 2054.76,895.83 2054.76,979.76 v1(2055,980) ; R29.1@2995,845.31 v1(2995,895)
  Bottom Layer w10: v1(2055,980) 2110,925 2965,925 v1(2995,895)
CHRG: U1.1 U4.10 | length 1664.4
  Top Layer w10: v1(535.95,759.4) U1.1@596.15,759.4 ; v1(940,960) 1071.35,828.65 1301.64,828.65 1486.99,1014 1663.54,1014 1740.01,1090.47 U4.10@1800.59,1090.47
  Bottom Layer w10: v1(535.95,759.4) 535.95,918.63 577.73,960.41 939.59,960.41 v1(940,960)
D+: R5.1 R9.2 USB1.A6 USB1.B6 | length 487.9
  Top Layer w10: USB1.B6@556.05,1289.9 515.32,1289.9 512.58,1287.16 490.54,1287.16 477.16,1300.54 477.16,1319.46 490.54,1332.84 509.46,1332.84 513.1,1329.2 USB1.A6@556.05,1329.2 753.25,1329.2 773.45,1349.4 R9.2@773.95,1349.4 773.95,1417.74 R5.1@775.95,1419.74
D-: R7.1 USB1.A7 USB1.B7 | length 407.2
  Top Layer w10: v1(500,1310) 510,1310 510.4,1309.6 USB1.A7@556.05,1309.6 753.15,1309.6 773.35,1289.4 R7.1@773.85,1289.4 ; v1(500,1370) 521.1,1348.9 USB1.B7@556.05,1348.9
  Bottom Layer w10: v1(500,1310) v1(500,1370)
GND: C1.1 C2.1 C3.2 C4.2 C5.1 C6.1 C7.1 C8.2 C9.2 C10.1 C11.1 C12.1 C13.1 C14.1 C15.1 C16.2 C17.2 C18.1 C19.1 H1.3 H2.4 H3.1 H3.6 H4.2 H5.1 H5.6 H6.2 LCD1.1 LDO1.2 Q4.2 Q5.2 R2.1 R3.1 R4.1 R6.2 R12.1 R13.1 R30.1 R31.1 SW1.3 SW1.4 U1.2 U2.2 U3.4 U4.12 U4.18 U4.31 U4.47 U4.63 USB1.17 USB1.18 USB1.19 USB1.20 USB1.A1 USB1.A12 X1.2 X1.4 | length 744
  Top Layer w10: v1(1585,950) 1650.46,950 1751.56,1051.1 U4.12@1800.59,1051.1 ; v1(1895,960) 1896.7,958.3 1896.7,895.93 U4.18@1897.04,895.59 ; U4.63@1897.04,1344.41 1897.39,1344.07 1897.39,1316.21 1923.91,1289.69 1925.31,1289.69 v1(1955,1260) ; U4.31@2152.94,895.59 2153.29,895.24 2153.29,867.4 2171.54,849.16 2294.16,849.16 2300.85,855.85 2300.85,879.35 2306.5,885 C10.1@2311.4,885 ; v1(2165,1260) 2167.62,1260 2179.67,1247.95 U4.47@2249.41,1247.95
  other v1: 2450,375 3610,390 3510,395 505,405 555,405 335,420 385,420 435,420 1270,420 1315,420 2450,425 1160,434 3510,465 3610,470 1160,480 3090,485 3125,485 2465,525 2520,525 2570,525 680,535 725,535 615,555 2570,570 3080,580 3135,580 3195,580 3255,580 585,815 625,815 665,815 2365,885 1585,900 465,905 465,950 1000,955 1040,955 900,1005 340,1020 400,1020 505,1020 560,1020 900,1045 920,1090 3005,1105 1415,1110 920,1130 1950,1130 2005,1130 2055,1130 1415,1150 3005,1155 1155,1215 3030,1220 1670,1255 1155,1260 1210,1260 2055,1260 2115,1260 2890,1270 2935,1270 2980,1270 3030,1270 1535,1280 1570,1280 1665,1400 1100,1465 1150,1475 1195,1475 1470,1495 1515,1495 2950,1495 1800,1510 1840,1510 2255,1510 2295,1510 2950,1540 350,1615 410,1615 500,1615 560,1615 1935,1615 3455,1775 805,1860 530,1865 615,1865 700,1865 530,1925 615,1925 805,1925 705,1930 3485,2080 3485,2140 3485,2195 3485,2860 970,2920 1110,2920 1250,2920 1390,2920 1530,2920 3485,2925 3485,2990 970,3020 1110,3020 1250,3020 1390,3020 1530,3020 3360,3080 3410,3080
KEY_L: R32.1 U4.15 | length 443.9
  Top Layer w10: U4.15@1800.59,992.05 1800.24,991.7 1772.41,991.7 1745,964.29 1745,685 1775,655 1829.66,655 R32.1@1830,654.66
KEY_M: D2.2 R33.1 U4.9 | length 846.6
  Top Layer w10: R33.1@1090.34,988.87 1079.75,999.46 D2.2@1079.75,1064.4 1084.7,1064.4 1117.1,1032 1656.09,1032 1734.25,1110.16 U4.9@1800.59,1110.16
KEY_R: R42.1 U4.16 | length 508.4
  Top Layer w10: U4.16@1800.59,972.36 1776.97,972.36 1761,956.39 1761,729 1785,705 1840,705 1885,660 1959.66,660 R42.1@1965,654.66
LCD_BLK: LCD1.8 U4.58 | length 2635.1
  Top Layer w10: v1(1970,1895) 1995.46,1869.54 U4.58@1995.46,1344.41
  Bottom Layer w10: LCD1.8@389.65,2620 1575,2620 1970,2225 v1(1970,1895)
LCD_CS: LCD1.7 U4.59 | length 2547.5
  Top Layer w10: v1(1930,1895) 1975.78,1849.22 U4.59@1975.78,1344.41
  Bottom Layer w10: LCD1.7@389.65,2520 586.65,2323 1807,2323 1930,2200 v1(1930,1895)
LCD_DC: LCD1.6 U4.61 | length 2467
  Top Layer w10: v1(1895,1895) 1895,1435 1936.41,1393.59 U4.61@1936.41,1344.41
  Bottom Layer w10: LCD1.6@389.65,2420 504.65,2305 1765,2305 1910,2160 1910,1939.54 1895,1924.54 v1(1895,1895)
LCD_FCS: LCD1.10 U4.54 | length 2831
  Top Layer w10: LCD1.10@389.65,2820 1510,2820 2075.84,2254.16 2075.84,1408.71 2074.2,1407.07 U4.54@2074.2,1344.41
LCD_FSO: LCD1.9 U4.56 | length 2728.1
  Top Layer w10: U4.56@2034.83,1344.41 2034.92,1344.5 2034.92,1899.92 v1(2035,1900)
  Bottom Layer w10: LCD1.9@389.65,2720 1535,2720 2035,2220 v1(2035,1900)
LCD_RES: LCD1.5 U4.62 | length 2372.5
  Top Layer w10: v1(1845,1900) 1877,1868 1877,1427.54 1916.38,1388.17 1916.38,1344.76 U4.62@1916.72,1344.41
  Bottom Layer w10: LCD1.5@389.65,2320 474.99,2234.66 1730.34,2234.66 1880,2085 1880,1935 v1(1845,1900)
LCD_SCL: LCD1.3 U4.55 | length 2387
  Top Layer w10: v1(1730,2165) 1850,2165 2057.84,1957.16 2057.84,1593.32 2054.52,1590.01 U4.55@2054.52,1344.41
  Bottom Layer w10: LCD1.3@389.65,2120 434.65,2165 v1(1730,2165)
LCD_SDA: LCD1.4 U4.57 | length 2313.6
  Top Layer w10: LCD1.4@389.65,2220 479.65,2130 1785,2130 2010,1905 2010,1880.46 2015.15,1875.3 U4.57@2015.15,1344.41
LED1: R17.1 U4.14 | length 981.9
  Top Layer w10: U4.14@1800.59,1011.73 1861.73,1011.73 v1(1920,1070) ; v1(2650,1205) 2650.3,1205.3 R17.1@2702.34,1205.3
  Bottom Layer w10: v1(1920,1070) 2217.5,1070 2352.5,1205 v1(2650,1205)
LED2: R18.1 U4.24 | length 880.1
  Top Layer w10: v1(2005,1045) 2005,965.67 2015.15,955.52 U4.24@2015.15,895.59 ; v1(2650,1115) 2650.3,1115.3 R18.1@2702.34,1115.3
  Bottom Layer w10: v1(2005,1045) 2292.5,1045 2362.5,1115 v1(2650,1115)
LED3: R23.1 U4.25 | length 795.1
  Top Layer w10: v1(2030,1010) 2030,966.13 2034.83,961.3 U4.25@2034.83,895.59 ; v1(2650,1025) 2650.3,1025.3 R23.1@2702.34,1025.3
  Bottom Layer w10: v1(2030,1010) 2032.62,1010 2047.62,1025 v1(2650,1025)
NetBUZZER1_2: BUZZER1.2 D4.1 Q4.3 | length 491.9
  Top Layer w30: Q4.3@3128.36,1360 3209.26,1360 3210.2,1359.06 D4.1@3215,1359.06 3219.8,1359.06 3220.16,1358.71 3220.16,1353.9 3438.04,1136.02 BUZZER1.2@3505,1136.02 BUZZER1.2@3505,1155.7
NetBUZZER2_2: BUZZER2.2 D5.1 Q5.3 | length 466.1
  Top Layer w30: D5.1@3155,814.06 3159.8,814.06 3244.25,729.61 3244.25,675 3308.23,611.02 BUZZER2.2@3505,611.02
NetC18_2: C18.2 Q4.1 R28.2 R30.2 | length 232.7
  Top Layer w10: R28.2@2815,1384.66 R30.2@2885,1384.66 2887.94,1387.6 C18.2@2960,1387.6 3019.92,1387.6 3031.69,1399.37 Q4.1@3041.64,1399.37
NetC19_2: C19.2 Q5.1 R29.2 R31.2 | length 244.8
  Top Layer w10: R29.2@2995,784.68 R31.2@2995,705.32 3077.72,705.32 C19.2@3080,707.6 3086.77,714.37 Q5.1@3156.64,714.37
NetD1_1: D1.1 D2.1 LDO1.3 R3.2 | length 1157.8
  Top Layer w10: v1(1045,740) 1045,689.8 971.79,616.59 928.21,616.59 917,605.38 917,514.62 974.02,457.6 LDO1.3@1108.8,457.6 ; v1(1220,1065) 1219.7,1064.7 1172.45,1064.7 D2.1@1172.15,1064.4 D1.1@1172.15,1144.4 1240.61,1144.4 R3.2@1240.95,1144.74
  Bottom Layer w10: v1(1045,740) 1070,765 1145,765 1220,840 v1(1220,1065)
NetH2_2: H2.2 R15.1 | length 117.4
  Top Layer w12: H2.2@2750,408.78 2752.5,411.28 2752.5,521.62 R15.1@2755,524.12
NetH2_3: H2.3 R16.1 | length 126
  Top Layer w12: H2.3@2650,408.78 2650,422.58 2675,447.58 R16.1@2675,524.46
NetH3_2: H3.2 R19.1 | length 385.5
  Top Layer w10: R19.1@3054.97,3019 3251,3019 H3.2@3385,2885
NetH3_4: H3.4 R20.1 | length 428
  Top Layer w10: R20.1@2988.44,2761 3060.62,2761 3123.9,2697.71 3297.75,2697.71 3310.46,2685 H3.4@3385,2685
NetH3_5: H3.5 R21.1 | length 435.8
  Top Layer w10: R21.1@2988.44,2679.71 3290.29,2679.71 H3.5@3385,2585
NetH4_3: H4.3 R24.1 | length 762.8
  Top Layer w10: R24.1@2988.44,2598.43 3172.42,2598.43 3230.34,2540.5 3403.43,2540.5 3494.15,2631.22 3494.15,2684.15 H4.3@3595,2785
NetH4_4: H4.4 R25.1 | length 770.6
  Top Layer w10: R25.1@2988.44,2517.14 3163.06,2517.14 3239.69,2440.5 3403.43,2440.5 3494.15,2531.22 3494.15,2584.15 H4.4@3595,2685
NetH4_5: H4.5 R26.1 | length 679.4
  Top Layer w10: R26.1@2988.44,2435.85 3198.43,2435.85 3211.78,2422.5 3432.51,2422.5 H4.5@3595,2585
NetH4_6: H4.6 R27.1 | length 660.6
  Top Layer w10: R27.1@2988.44,2354.57 3464.57,2354.57 H4.6@3595,2485
NetH5_2: H5.2 R34.1 | length 379.6
  Top Layer w10: R34.1@3054.97,2239.75 3265.26,2239.75 H5.2@3385,2120
NetH5_4: H5.4 R35.1 | length 437
  Top Layer w10: R35.1@2990.88,2021.85 2990.88,2020.72 3001.75,2009.84 3002.88,2009.84 3092.72,1920 H5.4@3385,1920
NetH5_5: H5.5 R36.1 | length 444.7
  Top Layer w10: R36.1@2990.88,1940.56 2990.88,1939.43 3001.75,1928.56 3002.88,1928.56 3111.43,1820 H5.5@3385,1820
NetH6_3: H6.3 R38.1 | length 771.1
  Top Layer w10: R38.1@2990.88,1859.28 3046.71,1859.28 3130.48,1775.51 3403.43,1775.51 3494.15,1866.22 3494.15,1919.15 H6.3@3595,2020
NetH6_4: H6.4 R39.1 | length 778.9
  Top Layer w10: R39.1@2990.88,1777.99 3102.54,1777.99 3205.02,1675.51 3403.43,1675.51 3494.15,1766.22 3494.15,1819.15 H6.4@3595,1920
NetH6_5: H6.5 R40.1 | length 687.7
  Top Layer w10: R40.1@2990.88,1696.71 3158.37,1696.71 3197.56,1657.51 3432.51,1657.51 H6.5@3595,1820
NetH6_6: H6.6 R41.1 | length 647.4
  Top Layer w10: R41.1@2990.88,1615.42 3490.42,1615.42 H6.6@3595,1720
NetLED1_2: LED1.2 R17.2 | length 91.8
  Top Layer w10: R17.2@2761.66,1205.3 LED1.2@2853.5,1205.3
NetLED2_2: LED2.2 R18.2 | length 91.8
  Top Layer w10: R18.2@2761.66,1115.3 LED2.2@2853.5,1115.3
NetLED3_2: LED3.2 R23.2 | length 91.8
  Top Layer w10: R23.2@2761.66,1025.3 LED3.2@2853.5,1025.3
NetQ1_1: Q1.1 R8.2 | length 80.7
  Top Layer w10: Q1.1@944.55,1472 944.55,1437.27 976.29,1405.53 R8.2@976.29,1404.4
NetQ1_3: Q1.3 R5.2 | length 84.1
  Top Layer w10: R5.2@775.95,1479.06 807.96,1479.06 831.3,1502.4 831.3,1502.6 838.1,1509.4 Q1.3@847.35,1509.4
NetQ3_1: Q3.1 R22.1 | length 110.8
  Top Layer w10: R22.1@3054.97,2937.71 3137.17,2937.71 3151.86,2952.41 Q3.1@3159.72,2952.41
NetQ6_1: Q6.1 R37.1 | length 116.7
  Top Layer w10: R37.1@3054.97,2158.46 3122.91,2158.46 3151.86,2187.41 Q6.1@3159.72,2187.41
NetR4_2: R4.2 U1.6 | length 67.1
  Top Layer w10: R4.2@590.61,934.4 596.15,928.86 U1.6@596.15,869.6
NetR32_2: R32.2 SW2.3 SW2.4 | length 412.7
  Top Layer w10: SW2.4@1500.27,511.34 SW2.3@1828.22,511.34 1828.22,593.56 R32.2@1830,595.34
NetR33_2: R33.2 SW3.3 SW3.4 | length 767.6
  Top Layer w10: SW3.4@1112.8,861.34 SW3.4@1113.91,861.34 ; R33.2@1149.66,990 1149.66,932.23 1127.48,910.05 1127.48,874.91 SW3.4@1113.91,861.34 ; v1(1405,990) 1276.34,861.34 SW3.4@1113.91,861.34 ; SW3.3@1440.75,861.34 1441.42,860.67 1534.33,860.67 v1(1535,860)
  Bottom Layer w10: v1(1405,990) v1(1535,860)
NetR42_2: R42.2 SW4.3 SW4.4 | length 415.7
  Top Layer w10: R42.2@1965,595.34 1955.97,586.31 SW4.4@1955.97,511.34 SW4.3@2283.92,511.34
NRST: C7.2 R14.1 SW1.1 SW1.2 U4.7 | length 1054.2
  Top Layer w10: SW1.1@1177.4,1592.4 SW1.2@1505.35,1592.4 1520.93,1592.4 1567.99,1545.34 R14.1@1600,1545.34 C7.2@1600,1467.6 1602.6,1465 v1(1675,1465) ; U4.7@1800.59,1149.53 1864.53,1149.53 v1(1865,1150)
  Bottom Layer w10: v1(1675,1465) 1865,1275 v1(1865,1150)
OSC_IN: C6.2 U4.5 X1.1 | length 360
  Top Layer w10: X1.1@1485.5,1223.4 1485.5,1219.45 1522.1,1182.85 1594.25,1182.85 1620,1208.6 1620,1213.5 1688.77,1213.5 1713.37,1188.9 U4.5@1800.59,1188.9
OSC_OUT: C8.1 U4.6 X1.3 | length 280.1
  Top Layer w10: X1.3@1554.4,1136.7 1554.4,1140.65 1578.6,1164.85 1606.45,1164.85 1620,1151.3 1620,1146.4 1680.94,1146.4 1703.75,1169.21 U4.6@1800.59,1169.21
POWER_EN: D1.2 R1.1 R2.2 U4.8 | length 1021.4
  Top Layer w10: R2.2@995.95,1069.06 R1.1@995.95,1144.74 996.29,1144.4 D1.2@1079.75,1144.4 1084.7,1144.4 1114.7,1174.4 1280.6,1174.4 1295,1160 1295,1085 1330,1050 1648.63,1050 1728.47,1129.84 U4.8@1800.59,1129.84
SPI_CS: U3.1 U4.20 | length 688
  Top Layer w10: U4.20@1936.41,895.59 1936.41,815.96 2065.37,687 2351.1,687 2428.1,610 U3.1@2459.5,610
SPI_MISO: U3.2 U4.22 | length 617.3
  Top Layer w10: U4.22@1975.78,895.59 1975.78,834.22 2073,737 2351.1,737 2428.1,660 U3.2@2459.5,660
SPI_MOSI: U3.5 U4.23 | length 274
  Top Layer w10: U4.23@1995.46,895.59 1995.46,839.54 2075,760 U3.5@2180.5,760
SPI_SCK: U3.6 U4.21 | length 346.2
  Top Layer w10: U4.21@1956.09,895.59 1956.09,818.91 2065,710 U3.6@2180.5,710
STDBY: U1.5 U4.11 | length 1367
  Top Layer w10: U1.5@633.55,869.6 633.55,906.67 650.95,924.07 v1(650.95,924.4) ; v1(940,925) 1054.35,810.65 1309.1,810.65 1487.09,988.65 1663.65,988.65 1745.79,1070.79 U4.11@1800.59,1070.79
  Bottom Layer w10: v1(650.95,924.4) 651.55,925 v1(940,925)
SWCLK: H1.2 U4.49 | length 1884.5
  Top Layer w10: U4.49@2172.63,1344.41 2172.63,1368.03 2209.6,1405 v1(2220,1405) ; v1(2845,955) 2845,738.7 3057.38,526.32 3148.68,526.32 H1.2@3255,420
  Bottom Layer w10: v1(2220,1405) 2785,1405 2845,1345 v1(2845,955)
SWDIO: H1.1 U4.46 | length 1715.9
  Top Layer w10: U4.46@2249.41,1228.27 2293.27,1228.27 v1(2305,1240) ; v1(2740,955) 2740,818.25 2827.84,730.4 2827.84,678.64 3134.93,371.55 3275.07,371.55 3293.07,389.55 3329,389.55 3355,415.55 H1.1@3355,420
  Bottom Layer w10: v1(2305,1240) 2647.3,1240 2740,1147.3 v1(2740,955)
TGT_A_BUSY: R24.2 U4.43 | length 1979.7
  Top Layer w10: U4.43@2249.41,1169.21 2312.84,1169.21 2334.32,1190.68 2334.32,1308.23 2341.54,1315.46 2341.54,2406.54 2533.43,2598.43 R24.2@2929.12,2598.43
TGT_A_NG: R25.2 U4.42 | length 1907.6
  Top Layer w10: U4.42@2249.41,1149.53 2318.62,1149.53 2359.54,1190.46 2359.54,2319.54 2557.14,2517.14 R25.2@2929.12,2517.14
TGT_A_OK: R26.2 U4.41 | length 1870.4
  Top Layer w10: U4.41@2249.41,1129.84 2324.38,1129.84 2384.77,1190.23 2384.77,2299.37 2521.26,2435.85 R26.2@2929.12,2435.85
TGT_A_RST: R19.2 U4.53 | length 2431.4
  Top Layer w10: U4.53@2093.89,1344.41 2093.89,2743.89 2388.51,3038.51 2815.39,3038.51 2834.9,3019 R19.2@2995.66,3019
TGT_A_START: R27.2 U4.40 | length 1853.7
  Top Layer w10: U4.40@2249.41,1110.16 2330.16,1110.16 2410,1190 2410,2250 2560,2400 2883.69,2400 R27.2@2929.12,2354.57
TGT_A_SWCLK: R21.2 U4.50 | length 1912.9
  Top Layer w10: U4.50@2152.94,1344.41 2152.94,2317.94 2530,2695 2913.84,2695 2917.12,2691.72 2918.25,2691.72 2929.12,2680.84 R21.2@2929.12,2679.71
TGT_A_SWDIO: R20.2 U4.51 | length 2035.5
  Top Layer w10: U4.51@2133.26,1344.41 2133.26,2453.26 2445,2765 2925.12,2765 R20.2@2929.12,2761
TGT_A_VCC: H3.3 Q3.3 | length 190.4
  Top Layer w20: Q3.3@3250.27,2915 3258.15,2915 3323,2850.15 3323,2847 H3.3@3385,2785
TGT_A_VCC_EN: R22.2 U4.52 | length 2267.5
  Top Layer w10: U4.52@2113.57,1344.41 2113.57,2583.57 2375,2845 2904.07,2845 R22.2@2995.66,2936.58
TGT_B_BUSY: R38.2 U4.35 | length 1443.7
  Top Layer w10: U4.35@2249.41,1011.73 2360.82,1011.73 2539.54,1190.46 2539.54,1839.54 2595,1895 2895.83,1895 2919.55,1871.29 2920.68,1871.29 2931.56,1860.41 R38.2@2931.56,1859.28
TGT_B_NG: R39.2 U4.34 | length 1194.9
  Top Layer w10: U4.34@2249.41,992.05 2366.59,992.05 2564.77,1190.23 2564.77,1509.77 2832.99,1777.99 R39.2@2931.56,1777.99
TGT_B_OK: R40.2 U4.33 | length 1128.6
  Top Layer w10: U4.33@2249.41,972.36 2372.36,972.36 2590,1190 2590,1440 2846.71,1696.71 R40.2@2931.56,1696.71
TGT_B_RST: R34.2 U4.39 | length 1709
  Top Layer w10: U4.39@2249.41,1090.47 2337.74,1090.47 2438.63,1191.37 2438.63,1998.63 2640,2200 2979.59,2200 2985.45,2205.86 2985.45,2229.54 R34.2@2995.66,2239.75
TGT_B_START: R41.2 U4.28 | length 1259.5
  Top Layer w10: U4.28@2093.89,895.59 2094.24,895.93 2094.24,926.61 2121.08,953.45 2378.91,953.45 2615,1189.54 2615,1370 2860.42,1615.42 R41.2@2931.56,1615.42
TGT_B_SWCLK: R36.2 U4.36 | length 1439
  Top Layer w10: U4.36@2249.41,1031.42 2355.05,1031.42 2514.32,1190.68 2514.32,1839.77 2615.11,1940.56 R36.2@2931.56,1940.56
TGT_B_SWDIO: R35.2 U4.37 | length 1469.8
  Top Layer w10: U4.37@2249.41,1051.1 2349.28,1051.1 2489.09,1190.91 2489.09,1849.09 2661.85,2021.85 R35.2@2931.56,2021.85
TGT_B_VCC: H5.3 Q6.3 | length 190.4
  Top Layer w20: Q6.3@3250.27,2150 3258.15,2150 3385,2023.15 H5.3@3385,2020
TGT_B_VCC_EN: R37.2 U4.38 | length 1647.2
  Top Layer w10: U4.38@2249.41,1070.79 2343.51,1070.79 2463.86,1191.14 2463.86,1958.86 2662.33,2157.33 2995.66,2157.33 R37.2@2995.66,2158.46
UART_RX: R16.2 U4.30 | length 761
  Top Layer w10: U4.30@2133.26,895.59 2133.61,895.24 2133.61,856.39 2165,825 2548.78,825 2675,698.78 R16.2@2675,583.78
UART_TX: R15.2 U4.29 | length 902.5
  Top Layer w10: U4.29@2113.57,895.59 2113.92,895.24 2113.92,851.08 2160,805 2543.33,805 2590.57,757.76 2590.57,616.95 2653.73,553.78 2724.21,553.78 R15.2@2753.87,583.44
USB_DM: R7.2 U4.44 | length 1527.7
  Top Layer w10: R7.2@807.95,1289.4 808.24,1289.4 813.89,1295.05 813.89,1303.54 819.75,1309.4 958.63,1309.4 982.07,1332.84 1785.75,1332.84 1833.74,1284.86 1839.5,1284.86 1861.12,1263.24 1861.12,1257.47 1930.01,1188.58 2249.09,1188.58 U4.44@2249.41,1188.9
USB_DP: R9.1 U4.45 | length 1525.8
  Top Layer w10: R9.1@808.05,1349.4 808.34,1349.4 813.99,1343.75 813.99,1335.26 819.85,1329.4 950.34,1329.4 973.78,1352.84 1794.04,1352.84 1844.02,1302.86 1846.96,1302.86 1879.12,1270.69 1879.12,1267.76 1938.3,1208.58 U4.45@2249.41,1208.58
USB_EN: R8.1 R10.2 U4.3 | length 1129.2
  Top Layer w10: R10.2@1030.95,1479.74 1030.95,1409.06 R8.1@1035.61,1404.4 1040.01,1400 v1(1085,1400) ; v1(1035,1255) 1090,1310 1670,1310 1751.73,1228.27 U4.3@1800.59,1228.27
  Bottom Layer w10: v1(1035,1255) 1035,1371.79 1063.21,1400 v1(1085,1400)
VCC_BT: D3.1 LDO1.1 Q2.2 SW3.1 SW3.2 | length 478.5
  Top Layer w10: LDO1.1@1108.8,532.4 1109.65,533.25 SW3.2@1109.65,682.6 SW3.1@1437.6,682.6
  other v1: 960,540 1010,540 1060,540 960,580 1010,580 1060,580 840,750 840,790 775,830 820,830 865,830 910,830
pads on no net: LDO1.4 U4.2 U4.4 USB1.A5 USB1.A8 USB1.B5 USB1.B8

## Polygon pours and split planes (outlines as drawn)
GND on Bottom Layer "GND_L02_P001" (solid, remove dead copper, pour order 1): 3730,3140 3730,285 345,285 340,280 245,280 245,3140 345,3140
GND on Top Layer "GND_L01_P000" (solid, remove dead copper, pour order 0): 3730,3140 3730,285 345,285 340,280 245,280 245,3140 345,3140

## Keep-outs
Keep-Out Layer:
  the board outline again, w10

## Other copper
Top Layer:
  region net 5V: 2640,2245 2740,2245 2740,2370 2640,2370
  region net 5V: 1020,1785 1020,1705 1540,1705 1540,1785
  region net 5V: 590,1232.74 590,1250 615,1275 616.4,1273.6 616.4,1232.49
  region net 5V: 615,1275 615,1232.5 692.5,1232.5 740,1185 745,1185 745,1260 730,1275
  region net 3.3V: 3120,964.65 3120.35,965 3305,965 3305,1090 3120,1090
  region net 3.3V: 3120,2070 3305,2070 3305,1965 3120,1965
  region net 3.3V: 3120,2840 3305,2840 3305,2720 3120,2720
  region net 3.3V: 3305,1470 3305,1570 3120,1570 3120,1470 3120,1570 3120,1470
  region net 3.3V: 1180,515 1360,515 1360,635 1180,635
  region net VCC_BT: 1130,522.1 1130,600 930,600 930,520 1127.9,520
  region net VCC_BT: 745,725 935,725 935,855 745,855
  region net BAT: 340.95,569.4 430.95,569.4 494.73,633.18 970,633.18 970,709.4 712.1,709.4 681.8,739.7 681.8,779.1 660.1,779.1 660.1,738.55 630.95,709.4 340.95,709.4
  region net 5V: 548.25,1234.75 699.4,1234.75 798.6,1135.55 798.6,867.3 699.2,867.3 681.8,849.9 660.1,849.9 660.1,889.3 695.95,925.15 695.95,1109.4 590.3,1215.05 548.25,1215.05
Bottom Layer:
  region net 5V: 1410,1785 2200,1785 2640,2225 2740,2225 2740,2185 2260,1705 1410,1705
  region net 5V: 2640,2370 2740,2370 2740,2225 2640,2225
  region net 5V: 625,1265 720,1265 730,1275 730,1645 790,1705 1155,1705 1155,1780 1150,1785 735,1785 615,1665 615,1275
  region net 5V: 615,1190 745,1190 745,1260 730,1275 615,1275
  region net 3.3V: 1180,515 1400,515 1555,670 3055,670 3305,920 3305,2840 3120,2840 3120,964.65 2965.35,810 1515,810 1340,635 1180,635
  region net 3.3V: 1180,635 1180,515 1360,515 1360,1970 1270,2060 350,2060 340,2050 340,1995 355,1980 1210,1980 1255,1935 1255,710
  region net VCC_BT: 745,855 935,855 935,785 1130,590 1130,522.1 1127.9,520 930,520 930,540 745,725

## Silkscreen, mask and mechanical layers (free items; w line width, h text height)
Mechanical 1:
  the board outline again, w10

## Text inside footprints (layer, text, board x,y; h text height)
BUZZER1: Top Overlay "+" at 3637.28,1505.71 h80 r180; Top Overlay "-" at 3637.28,1203.74 h80 r180
BUZZER2: Top Overlay "-" at 3637.28,678.74 h80 r180; Top Overlay "+" at 3637.28,980.71 h80 r180